# Altium PCB 0.PCB1.PcbDoc (part 4 of 12)
Units mm, origin at the board's own origin, x right, y up, seen from the top; angles counter-clockwise.
Board outline 77 x 72 mm, 6 copper layers (Top Layer, Layer 1, Layer 3, Layer 4, Layer 2, Bottom Layer), stack 1.538 mm thick; 570 components, 490 nets, 3331 pads, 1909 vias.
Unrouted connection lines stored in the file: 2.
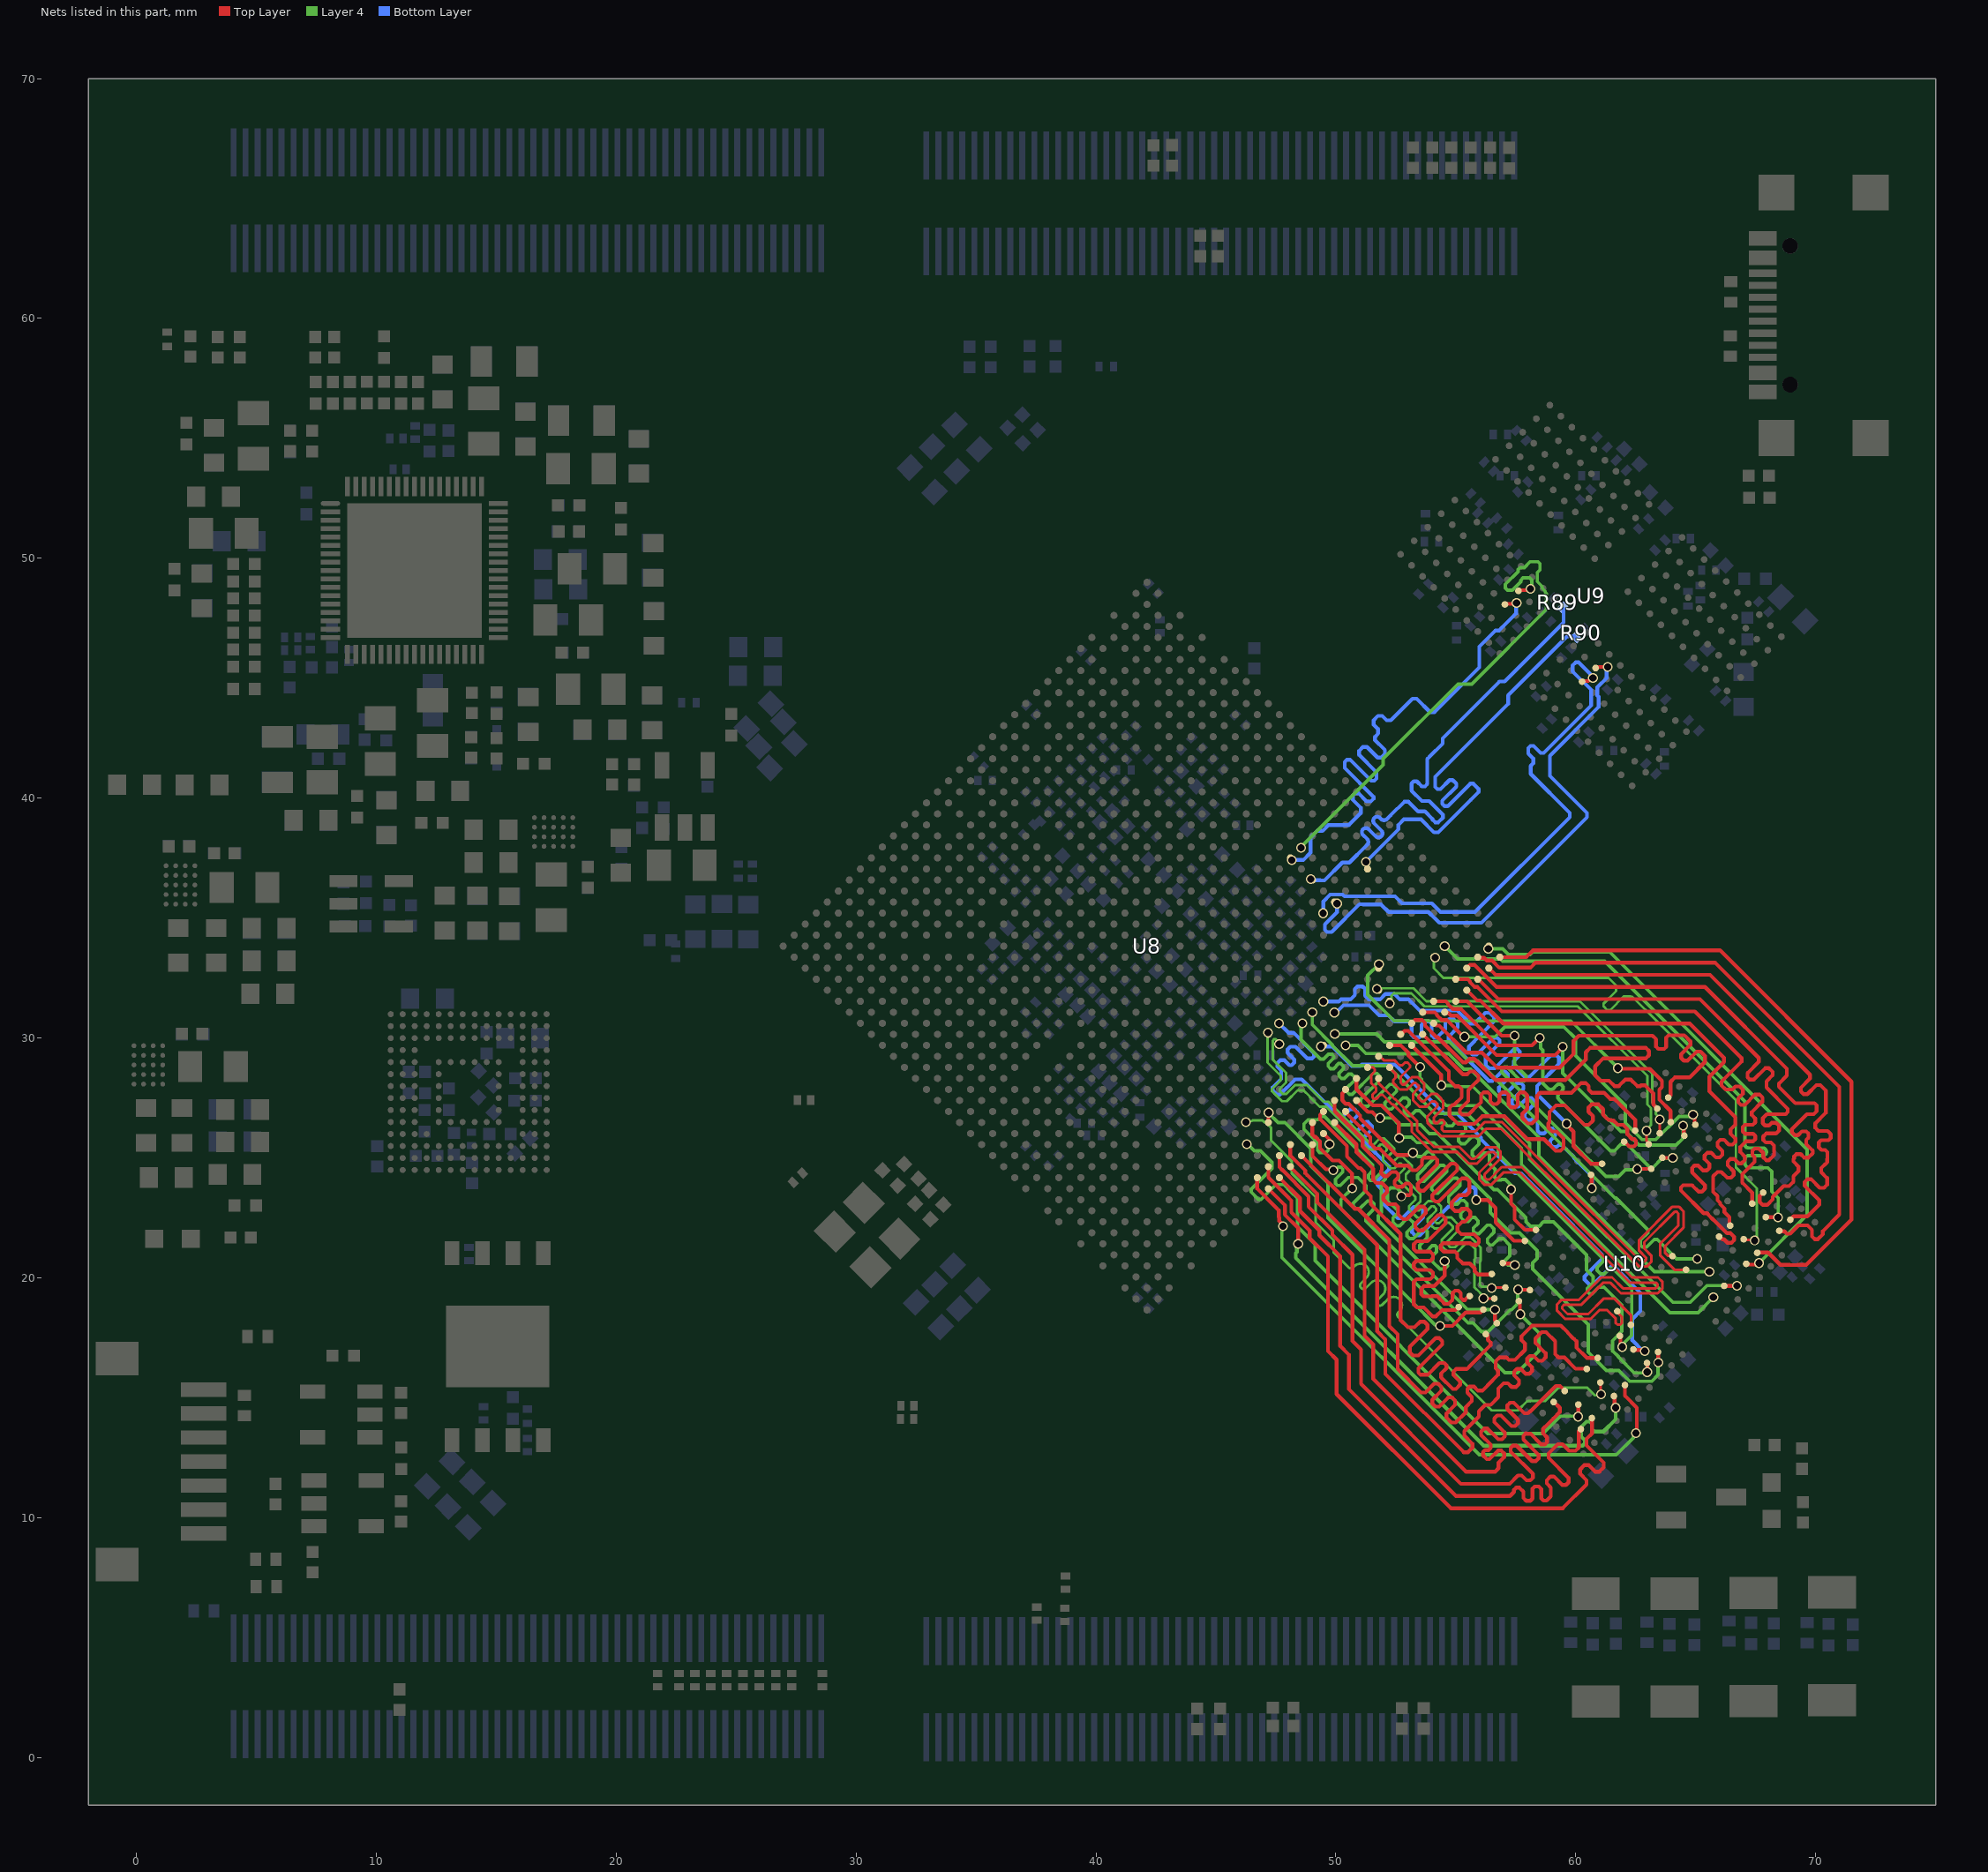
[diagram p8: the nets of this part, all layers, seen from the top]

## Via types
v1: diameter 0.41, hole 0.3, Top Layer to Bottom Layer, tented both sides, 1901 vias
v2: diameter 0.41, hole 0.3, Top Layer to Bottom Layer, 8 vias

## Nets (pads, with @x,y where several pads share a name; then routed paths per layer and width w, separated by ;. In a path a pad name is that pad's centre, name@x,y a point inside that pad or via, vN(x,y) a via of type N, cw(c..) or ccw(c..) an arc to the next point about the centre after c; other vN are vias at no path point) (continued)
DDR_CH0_LP4/4X_CKE1_A: R89.1 U8.N7 | length 22.1
  Bottom Layer w0.156: v1(48.963,36.627) 49.019,36.571 49.341,36.571 49.344,36.568 49.528,36.568 50.27,37.31 50.566,37.31 51.253,37.997 51.308,38.053 ccw(c51.19,38.171) 51.308,38.289 51.135,38.462 cw(c51.253,38.58) 51.135,38.698 cw(c51.253,38.58) 51.371,38.698 51.662,38.408 ccw(c51.781,38.526) 51.899,38.408 ccw(c51.781,38.526) 51.899,38.644 51.608,38.935 cw(c51.726,39.053) 51.608,39.171 cw(c51.726,39.053) 51.844,39.171 51.893,39.122 ccw(c52.011,39.241) 52.129,39.122 52.163,39.156 52.252,39.245 52.307,39.3 52.852,39.845 53.031,39.845 53.432,39.444 53.715,39.444 54.02,39.139 54.02,39.114 54.146,38.988 54.275,38.988 54.463,39.176 54.463,39.306 53.893,39.876 53.588,39.876 53.156,40.308 53.156,40.604 53.248,40.696 53.378,40.696 53.587,40.487 53.717,40.487 53.817,40.587 53.817,41.628 53.918,41.73 ; 53.915,41.734 54.453,42.272 54.453,42.488 56.824,44.858 57.039,44.858 59.497,47.316 R89.1@59.497,47.896
DDR_CH0_LP4/4X_CKE1_B: R90.1 U8.L4 | length 20.1
  Top Layer w0.156: v1(51.251,37.335) 51.295,37.291 51.295,37.071 U8.L4@51.323,37.043
  Bottom Layer w0.156: v1(51.251,37.335) 52.612,38.696 52.612,38.886 52.836,39.111 53.555,39.111 54.094,38.572 54.273,38.572 55.62,39.919 55.95,40.249 55.95,40.384 55.736,40.598 55.606,40.598 54.669,39.661 54.539,39.661 54.44,39.76 54.44,39.89 55.022,40.471 55.022,40.601 54.872,40.751 54.743,40.751 54.368,40.376 54.239,40.376 54.147,40.468 54.147,40.892 54.325,41.07 ; 54.326,41.068 57.183,43.924 57.183,44.284 59.643,46.744 59.936,46.744 R90.1@60.023,46.657
DDR_CH0_LP4/4X_CS0_A: U8.R6 U9.H4 | length 21
  Top Layer w0.156: U9.H4@57.615,48.64 57.639,48.664 57.978,48.664 58.034,48.72 v1(58.113,48.72)
  Layer 4 w0.142: v1(48.555,37.93) 48.555,37.965 51.978,41.388 51.978,41.646 55.089,44.757 55.673,44.757 58.784,47.868 58.784,48.523 58.734,48.573 58.734,48.623 58.603,48.754 58.603,48.822 58.4,49.026 58.4,49.399 58.512,49.512 58.512,49.772 58.429,49.855 58.104,49.855 57.86,49.611 57.685,49.611 57.601,49.528 57.601,49.444 57.073,48.916 57.073,48.756 57.165,48.664 57.355,48.664 57.706,49.015 57.706,49.073 57.81,49.177 58.084,49.177 58.17,49.091 58.17,49.066 58.165,49.06 58.165,48.793 v1@58.132,48.761
DDR_CH0_LP4/4X_CS0_B: U8.L7 U9.R4 | length 23.3
  Top Layer w0.156: U9.R4@60.833,45.423 60.856,45.446 60.937,45.446 60.955,45.464 v1(61.335,45.464)
  Bottom Layer w0.156: v1(50.052,35.6) 50.052,35.242 49.547,34.737 49.547,34.509 49.641,34.415 49.832,34.415 50.985,35.568 51.137,35.568 ; 51.137,35.559 51.893,35.559 52.203,35.249 53.86,35.249 54.141,34.968 ; 54.147,34.974 54.32,34.8 56.069,34.8 60.47,39.201 60.47,39.38 58.922,40.928 58.922,41.762 60.953,43.793 60.953,44.223 60.905,44.271 60.905,44.617 61.292,45.004 61.292,45.421 v1(61.335,45.464)
DDR_CH0_LP4/4X_CS1_A: U8.R7 U9.H3 | length 24.2
  Top Layer w0.156: U9.H3@57.05,48.074 57.073,48.098 57.499,48.098 v1(57.536,48.135)
  Bottom Layer w0.156: v1(48.172,37.417) 48.64,37.417 48.949,37.726 48.949,38.361 49.219,38.631 49.448,38.631 49.693,38.876 50.544,38.876 51.04,39.373 51.04,39.599 50.71,39.929 50.71,40.102 50.809,40.201 50.939,40.201 51.284,39.855 51.457,39.855 51.574,39.972 51.574,40.049 50.37,41.252 50.37,41.504 50.465,41.599 50.595,41.599 51.475,40.719 51.5,40.719 51.604,40.719 51.696,40.811 51.696,41.077 50.975,41.799 50.975,41.976 51.127,42.129 51.302,42.129 51.742,41.689 51.902,41.689 52.049,41.837 52.049,42.004 51.635,42.418 51.635,42.548 51.757,42.67 51.757,42.708 ; 51.759,42.703 51.759,42.883 51.579,43.062 51.579,43.242 51.759,43.422 51.938,43.422 52.118,43.242 52.298,43.242 53.196,44.14 53.375,44.14 53.932,43.583 54.112,43.583 55.979,45.451 55.979,46.31 56.658,46.989 56.809,46.989 57.515,47.695 57.515,48.114 v1(57.536,48.135)
DDR_CH0_LP4/4X_CS1_B: U8.L8 U9.R3 | length 23.8
  Top Layer w0.156: U9.R3@60.267,44.857 60.291,44.881 60.528,44.881 60.649,45.001 v1(60.718,45.001)
  Bottom Layer w0.156: v1(49.475,35.196) 49.48,35.201 49.48,35.688 49.768,35.976 50.285,35.976 50.36,35.9 52.471,35.9 52.763,35.609 54.004,35.609 54.363,35.249 55.8,35.249 59.751,39.201 59.751,39.38 58.125,41.006 58.125,41.34 58.231,41.446 58.231,41.649 58.026,41.854 58.026,42.08 58.117,42.172 58.247,42.172 58.537,41.881 58.667,41.881 60.649,43.864 60.649,44.509 59.87,45.289 59.87,45.527 60.005,45.663 60.117,45.663 60.708,45.073 v1@60.708,45.029
DDR_CH1_A0_C: U8.G12 U10.H2 | length 24.6
  Top Layer w0.156: v1@59.639,26.363 59.908,26.094 59.908,25.483 60.639,24.752 U10.H2@61.099,24.752
  Bottom Layer w0.156: v1@49.575,31.523 49.58,31.518 50.129,31.518 50.216,31.606 50.611,31.606 50.794,31.789 50.794,32.037 50.901,32.144 51.117,32.144 51.226,32.035 51.226,31.758 51.378,31.606 51.846,31.606 52.074,31.833 52.256,31.833 52.44,31.833 52.668,31.606 53.034,31.606 53.504,31.136 55.067,31.136 55.606,30.597 55.785,30.597 56.234,31.046 56.414,31.046 56.594,30.866 56.594,30.687 56.055,30.148 56.055,30.143 55.549,29.637 55.549,29.449 55.701,29.297 55.877,29.297 56.58,30 56.736,30 56.828,29.909 56.828,29.779 56.245,29.196 56.245,28.88 56.397,28.728 56.624,28.728 57.434,29.538 57.563,29.538 57.667,29.434 57.667,29.279 57.413,29.025 57.413,28.852 ; 57.402,28.841 57.863,28.38 58.076,28.38 58.965,29.269 59.209,29.269 59.301,29.177 59.301,28.904 58.39,27.993 58.39,27.654 v1(59.62,26.424)
  other v1: 49.48,31.518
DDR_CH1_A0_D: U8.H15 U10.R2 | length 27.7
  Top Layer w0.156: v1(55.849,23.239) 56.331,23.239 56.66,22.91 56.66,22.301 56.729,22.232 57.427,21.535 U10.R2@57.882,21.535
  Bottom Layer w0.156: v1(47.635,30.605) 48.026,30.215 48.235,30.215 49.092,29.358 49.092,29.228 49.009,29.144 48.81,29.144 48.323,29.632 48.099,29.632 47.99,29.523 47.99,29.381 48.269,29.101 48.269,28.972 48.158,28.86 48.066,28.86 47.858,29.068 47.69,29.068 47.562,28.94 47.562,28.805 47.726,28.641 47.726,28.293 47.369,27.937 47.369,27.807 47.54,27.636 47.67,27.636 48.308,28.273 48.582,28.273 48.879,27.976 ; 48.899,27.956 48.879,27.976 ; v1(55.849,23.239) 55.827,23.261 55.827,23.68 55.735,23.772 55.606,23.772 54.798,22.964 54.693,22.964 53.488,21.759 53.308,21.759 53.181,21.886 53.181,22.066 53.639,22.523 53.639,22.868 53.547,22.959 53.249,22.959 52.768,22.479 52.588,22.479 52.014,23.053 52.014,23.592 51.744,23.862 51.744,24.041 52.218,24.515 52.218,24.645 51.156,25.707 51.156,25.836 51.516,26.195 51.516,26.325 51.348,26.493 51.269,26.493 50.859,26.083 50.781,26.083 50.567,26.296 50.567,26.426 50.908,26.767 50.908,26.896 50.771,27.034 50.611,27.034 50.285,26.707 50.156,26.707 48.887,27.976 48.879,27.976
DDR_CH1_A1_C: U8.F12 U10.J2 | length 23
  Top Layer w0.156: U10.J2@60.639,24.293 60.663,24.269 60.663,23.744 v1(60.67,23.737)
  Bottom Layer w0.156: v1@49.981,31.087 50.048,31.087 50.318,31.358 51.387,31.358 51.81,30.935 52.191,30.935 52.44,30.687 53.022,30.687 53.158,30.55 53.158,30.126 53.255,30.028 53.484,30.028 53.576,30.12 53.576,30.544 53.713,30.681 ; 53.713,30.687 53.9,30.687 53.997,30.589 53.997,30.105 54.089,30.013 54.218,30.013 54.564,30.358 54.564,30.632 54.723,30.792 54.903,30.792 55.083,30.612 55.083,30.433 54.708,30.058 54.708,29.878 56.377,28.209 56.535,28.209 56.931,28.606 57.061,28.606 57.175,28.492 57.175,28.311 57.006,28.142 ; 57.006,28.141 56.804,27.94 56.804,27.782 56.916,27.67 57.073,27.67 ; 57.074,27.671 57.088,27.671 57.519,28.102 57.727,28.102 57.821,28.008 57.821,27.879 57.343,27.401 57.343,27.243 57.455,27.132 57.612,27.132 57.972,27.491 58.157,27.491 58.249,27.399 58.249,27.215 57.876,26.842 57.876,26.684 57.988,26.573 58.146,26.573 58.188,26.615 58.318,26.615 58.41,26.524 58.41,26.126 58.521,26.014 58.679,26.014 58.881,26.215 59.038,26.215 59.15,26.104 59.15,25.946 ; 59.145,25.926 58.943,25.725 58.943,25.567 59.055,25.455 59.213,25.455 59.291,25.534 59.421,25.534 59.62,25.334 59.926,25.028 59.926,25.002 60.679,24.25 60.679,23.745 v1(60.67,23.737)
  other v1: 49.94,31.059
DDR_CH1_A1_D: U8.G14 U10.P2 | length 24.9
  Top Layer w0.156: v1(57.309,23.679) 57.309,23.082 57.454,22.938 57.454,22.694 57.454,22.427 57.886,21.994 U10.P2@58.341,21.994
  Layer 4 w0.142: v1(48.608,30.609) 48.559,30.559 48.559,29.919 49.364,29.114 49.484,29.114 49.689,29.32 49.839,29.32 49.923,29.236 49.923,29.17 49.684,28.931 49.684,28.814 49.781,28.718 49.908,28.718 50.119,28.928 50.21,28.928 50.314,28.824 50.314,28.707 50.134,28.527 50.134,28.408 50.234,28.308 50.352,28.308 50.537,28.493 50.655,28.493 50.771,28.377 50.771,28.225 50.467,27.92 50.467,27.745 50.568,27.643 50.688,27.643 51.561,28.517 51.721,28.517 51.853,28.385 51.853,28.258 51.036,27.44 51.036,27.252 51.145,27.143 51.34,27.143 52.255,28.058 52.373,28.058 52.495,27.937 52.533,27.898 52.533,27.78 52.052,27.299 52.052,27.141 52.164,27.029 52.321,27.029 52.792,27.5 52.95,27.5 53.062,27.388 53.062,27.231 52.86,27.029 52.86,26.872 52.972,26.76 53.129,26.76 53.331,26.961 53.489,26.961 53.988,26.462 54.527,26.462 54.661,26.328 54.84,26.328 54.975,26.462 55.245,26.462 55.407,26.301 55.407,26.143 55.115,25.852 55.115,25.694 55.227,25.582 55.385,25.582 55.676,25.873 55.834,25.873 55.962,25.745 55.962,25.565 55.693,25.296 55.693,25.116 55.783,25.026 55.986,25.026 56.154,25.194 56.333,25.194 56.411,25.116 56.411,24.757 56.644,24.525 56.644,24.367 56.622,24.345 56.622,24.188 56.733,24.076 56.891,24.076 56.913,24.098 57.071,24.098 57.309,23.859 v1(57.309,23.679)
DDR_CH1_A2_C: U8.E13 U10.H9 | length 20.1
  Top Layer w0.156: U10.H9@65.059,20.792 65.062,20.792 v1(65.072,20.783)
  Layer 4 w0.142: v1(49.96,30.162) 49.962,30.16 51.711,30.16 52.031,29.84 54.741,29.84 55.531,29.05 55.905,29.05 61.638,23.317 61.678,23.317 63.002,21.993 63.002,21.875 62.707,21.58 62.707,21.359 62.791,21.275 62.961,21.275 63.273,21.588 63.403,21.588 64.208,20.783 v1(65.072,20.783)
DDR_CH1_A2_D: U8.G13 U10.R9 | length 22.5
  Top Layer w0.156: U10.R9@61.842,17.575 61.865,17.551 61.865,17.276 61.945,17.197 v1(61.945,17.117)
  Layer 4 w0.142: v1@49.016,31.037 49.023,31.03 49.023,30.551 49.862,29.712 49.862,29.676 50.701,28.837 52.152,28.837 54.146,26.843 55.47,26.843 56.771,25.543 56.771,25.162 58.109,23.823 61.143,20.79 61.143,20.672 60.899,20.428 60.899,20.31 61.046,20.163 61.196,20.163 61.423,20.391 61.542,20.391 62.338,19.594 62.338,17.604 v1@61.925,17.19
  other v1: 49.023,31.063
DDR_CH1_A3_C: U8.D13 U10.H10 | length 19.6
  Top Layer w0.156: v1(65.572,20.247) 65.597,20.247 U10.H10@65.628,20.216
  Layer 4 w0.142: v1(50.405,29.688) 50.918,29.688 51.258,29.348 52.192,29.348 52.204,29.337 54.704,29.337 55.341,28.7 55.62,28.7 58.47,25.85 58.47,25.066 63.289,20.247 v1(65.572,20.247)
DDR_CH1_A3_D: U8.E14 U10.R10 | length 23.2
  Top Layer w0.156: U10.R10@62.407,17.009 62.431,16.986 62.838,16.986 v1(62.885,16.94)
  Bottom Layer w0.156: v1(49.383,29.643) 49.385,29.641 49.853,29.641 50.664,28.83 51.025,28.83 51.085,28.891 52.463,28.891 54.522,26.832 55.066,26.832 56.055,25.843 56.055,25.765 57.467,24.353 57.719,24.353 58.179,23.893 58.749,23.323 61.099,20.973 61.099,20.783 60.369,20.052 60.369,19.923 60.588,19.703 60.718,19.703 61.478,20.464 61.608,20.464 62.7,19.371 62.7,18.617 62.359,18.276 62.359,17.39 62.807,16.942 v1@62.826,16.942
DDR_CH1_A4_C: U8.A10 U10.H11 | length 19.3
  Top Layer w0.156: U8.A10@53.161,29.689 53.704,29.146 54.391,28.46 54.391,28.03 v1(54.401,28.02) ; U10.H11@66.263,19.683 66.288,19.657 v1(66.72,19.657)
  Layer 4 w0.142: v1(54.401,28.02) 54.907,28.02 54.961,27.965 55.718,27.965 58.084,25.599 58.084,24.941 58.656,24.369 64.05,18.974 64.772,18.974 65.469,19.671 v1@66.655,19.671
DDR_CH1_A4_D: U8.A15 U10.R11 | length 20.4
  Top Layer w0.156: U8.A15@50.863,27.391 51.341,26.913 51.518,26.913 51.77,26.661 v1(51.849,26.661) ; v1(62.981,16.069) 62.986,16.073 U10.R11@62.986,16.381
  Layer 4 w0.142: v1(51.849,26.661) 52.352,26.661 52.64,26.373 53.538,26.373 53.897,26.014 54.256,26.014 56.591,23.679 56.747,23.679 57.925,22.501 57.925,22.393 57.938,22.38 57.938,22.332 58.118,22.153 58.477,22.153 58.656,22.332 59.067,22.332 60.453,20.946 60.453,20.327 60.733,20.046 60.733,19.795 60.489,19.551 60.489,19.419 60.573,19.336 60.691,19.336 60.954,19.599 61.175,19.599 ; 61.178,19.602 61.925,18.854 61.925,17.77 61.53,17.375 61.53,16.946 61.546,16.946 61.773,16.719 61.773,16.701 62.444,16.03 62.943,16.03 v1(62.981,16.069)
DDR_CH1_A5_C: U8.B11 U10.J11 | length 19.2
  Top Layer w0.156: U8.B11@52.242,29.689 52.709,29.689 53.029,29.369 53.029,29.264 53.425,28.867 v1(53.512,28.781) ; U10.J11@65.731,19.201 65.74,19.19 v1(65.74,19.182)
  Layer 4 w0.142: v1(53.512,28.781) 53.507,28.776 53.507,28.339 53.579,28.268 53.579,28.204 54.606,27.176 55.968,27.176 57.74,25.404 57.74,24.725 58.376,24.09 63.923,18.542 65.099,18.542 v1(65.74,19.182)
DDR_CH1_A5_D: U8.B14 U10.P11 | length 21.3
  Top Layer w0.156: U8.B14@50.865,28.312 50.863,28.309 50.863,27.858 51.54,27.182 51.74,27.182 51.901,27.182 52.628,26.454 52.628,25.845 v1(52.646,25.827) ; U10.P11@63.433,16.903 63.438,16.898 63.438,16.462 v1(63.443,16.457)
  Layer 4 w0.142: v1(52.646,25.827) 52.677,25.857 53.156,25.857 53.38,25.633 54.098,25.633 56.447,23.284 56.447,22.714 56.724,22.437 57.296,21.865 57.651,21.865 58.387,21.129 58.387,20.806 58.207,20.626 58.207,20.361 60.524,18.045 60.524,16.897 61.285,16.136 61.8,16.136 62.255,15.681 63.168,15.681 63.438,15.951 v1@63.438,16.495
DDR_CH1_CLKN_C: U8.A12 U10.J9 | length 23.5
  Top Layer w0.112: U8.A12@52.244,28.771 52.244,28.758 52.498,28.504 52.498,28.346 52.389,28.237 52.389,28.132 52.675,27.846 52.978,27.846 53.255,28.123 53.337,28.123 53.456,28.004 53.456,27.912 53.282,27.739 53.282,27.724 53.225,27.666 53.225,27.396 53.496,27.125 53.771,27.125 53.995,27.349 54.132,27.349 54.24,27.24 54.24,27.147 53.812,26.719 53.812,26.518 ; 53.822,26.477 53.822,26.46 54.387,25.895 55.95,25.895 56.273,26.218 56.883,26.218 58.706,24.395 58.715,24.395 62.645,20.465 62.959,20.465 63.149,20.656 63.149,20.925 62.861,21.213 62.861,21.486 64.122,22.748 64.215,22.748 64.28,22.682 64.28,22.173 63.517,21.41 63.517,20.942 64.126,20.333 U10.J9@64.595,20.333
DDR_CH1_CLKN_D: U8.A13 U10.P9 | length 27.2
  Top Layer w0.112: U8.A13@51.785,28.312 51.797,28.3 51.797,28.099 52.454,27.442 52.479,27.442 53.385,26.535 53.385,26.17 54.096,25.459 55.15,25.459 55.645,24.964 55.785,24.964 56.263,25.442 56.683,25.442 56.874,25.251 56.874,24.982 56.195,24.304 56.195,24.182 56.282,24.096 56.404,24.096 56.915,24.607 57.748,24.607 58.321,24.035 60.122,22.233 62.346,20.01 63.433,20.01 63.624,19.82 63.624,19.55 63.421,19.348 61.886,19.348 61.433,19.8 61.161,19.8 60.227,18.867 59.505,18.867 59.439,18.801 59.439,18.709 59.659,18.489 60.525,18.489 61.158,19.121 61.621,19.121 62.301,18.441 U10.P9@62.301,18.035
DDR_CH1_CLKP_C: U8.B12 U10.J8 | length 24.7
  Top Layer w0.112: U8.B12@51.785,29.231 51.832,29.231 U8.B12@51.828,29.231 ; U8.B12@51.838,29.228 51.838,29.224 51.995,29.067 52.443,29.067 52.651,28.859 52.774,28.859 52.892,28.976 52.984,28.976 53.099,28.862 53.099,28.769 52.711,28.381 52.711,28.125 52.776,28.059 52.869,28.059 53.167,28.357 53.423,28.357 53.682,28.098 53.682,27.811 53.446,27.575 53.446,27.488 53.581,27.353 53.674,27.353 53.984,27.663 54.203,27.663 54.398,27.468 54.398,27.445 54.48,27.364 54.48,27.265 54.477,27.262 54.477,27.064 54.084,26.67 54.084,26.5 54.139,26.445 54.231,26.445 54.373,26.587 54.383,26.587 ; 54.383,26.584 54.447,26.584 54.524,26.507 54.524,26.414 54.428,26.319 54.428,26.174 54.493,26.109 55.823,26.109 56.197,26.482 56.938,26.482 58.866,24.554 58.866,24.546 62.733,20.678 62.87,20.678 62.936,20.744 62.936,20.836 62.647,21.125 62.647,21.575 64.034,22.961 64.303,22.961 64.494,22.771 64.494,22.085 63.73,21.321 63.73,21.03 63.842,20.919 64.03,20.919 U10.J8@64.039,20.909
DDR_CH1_CLKP_D: U8.B13 U10.P8 | length 28.8
  Top Layer w0.112: U8.B13@51.356,28.822 U8.B13@51.403,28.774 ; U8.B13@51.368,28.781 51.375,28.774 U8.B13@51.403,28.774 ; 52.372,27.224 52.351,27.224 51.952,27.624 51.859,27.624 51.691,27.456 51.599,27.456 51.524,27.531 51.524,27.623 51.686,27.785 51.686,27.908 51.485,28.109 51.485,28.456 51.627,28.598 51.627,28.691 51.544,28.774 U8.B13@51.403,28.774 ; 52.39,27.228 53.172,26.447 53.172,26.082 54.008,25.245 55.062,25.245 55.557,24.75 55.873,24.75 56.351,25.228 56.595,25.228 56.66,25.163 56.66,25.07 55.982,24.392 55.982,24.094 56.193,23.882 56.492,23.882 57.004,24.394 57.66,24.394 59.909,22.145 62.257,19.797 63.345,19.797 63.41,19.731 63.41,19.639 63.333,19.561 61.974,19.561 61.521,20.014 61.072,20.014 60.139,19.08 59.416,19.08 59.226,18.89 59.226,18.62 59.571,18.275 60.614,18.275 60.982,18.644 61.32,18.644 61.67,18.293 61.67,18.107 61.736,18.042 61.856,18.042 61.922,18.107 61.922,18.368 61.759,18.531 U10.P8@61.759,18.606
DDR_CH1_DM0_C: U8.F8 U10.C3 | length 17.1
  Top Layer w0.156: v1@61.784,28.714 63,28.714 63.092,28.714 63.601,28.205 63.601,27.947 63.491,27.837 63.491,27.421 63.953,26.958 U10.C3@63.953,26.501
  Layer 4 w0.142: v1(51.8,33.076) 51.334,32.611 51.334,31.808 52.434,30.709 55.267,30.709 59.799,30.709 v1@61.746,28.762
  other v1: 61.757,28.741
DDR_CH1_DM0_D: U8.D20 U10.Y3 | length 14.4
  Top Layer w0.156: U8.D20@47.186,26.471 47.192,26.478 47.192,26.877 v1(47.198,26.883) ; v1(54.34,17.994) 54.861,17.994 55.418,18.55 56.028,18.55 U10.Y3@56.149,18.671
  Layer 4 w0.142: v1(47.198,26.883) 47.198,26.861 47.596,26.463 47.88,26.463 48.958,25.385 48.958,24.667 49.676,23.949 49.676,22.871 ; 49.677,22.871 49.677,22.499 53.231,18.945 54.131,18.045 ; v1@54.287,18.045 v1@54.295,18.052
DDR_CH1_DM1_C: U8.D4 U10.C10 | length 23.1
  Top Layer w0.156: U10.C10@67.939,22.528 67.946,22.521 68.425,22.521 v1(68.429,22.516)
  Layer 4 w0.142: v1(54.541,33.83) 55.083,33.288 56.86,33.288 56.95,33.198 61.206,33.198 67.05,27.355 67.05,25.641 67.05,25.57 ccw(c67.21,25.57) 67.21,25.409 67.793,25.409 cw(c67.793,25.249) 67.793,25.089 67.21,25.089 ccw(c67.21,24.929) 67.05,24.929 67.05,24.715 67.131,24.633 67.162,24.603 ; 67.173,24.614 67.203,24.585 68.015,24.585 68.176,24.425 68.176,23.59 68.445,23.32 68.445,22.589 v1@68.499,22.535
DDR_CH1_DM1_D: U8.D22 U10.Y10 | length 23.2
  Top Layer w0.156: v1(60.107,14.212) 60.108,14.213 60.108,14.71 U10.Y10@60.109,14.711
  Layer 4 w0.142: v1(46.286,25.57) 46.324,25.57 46.599,25.295 46.858,25.295 47.34,24.814 47.34,24.557 46.47,23.688 46.47,23.57 46.769,23.271 46.887,23.271 47.5,23.884 47.827,23.884 48.135,23.577 48.399,23.312 48.399,22.126 49.137,21.388 49.137,20.705 56.338,13.504 58.629,13.504 59.351,14.226 60.093,14.226 v1(60.107,14.212)
DDR_CH1_DQ0_C: U8.A8 U10.B2 | length 18.1
  Top Layer w0.156: U8.A8@54.083,30.61 54.182,30.511 54.313,30.511 55.438,29.386 56.093,29.386 56.717,28.762 59.339,28.762 59.914,29.337 59.914,29.876 60.128,30.09 63.201,30.09 63.352,29.939 63.352,29.632 63.444,29.541 63.69,29.541 63.769,29.619 63.769,30.005 63.873,30.11 64.515,30.11 ; U10.B2@63.863,27.52 63.955,27.612 63.955,28.17 64.134,28.349 64.745,28.349 65.392,28.996 65.392,29.247 65.206,29.433 65.048,29.433 64.667,29.052 64.509,29.052 64.398,29.164 64.398,29.321 64.779,29.702 64.779,29.86 64.549,30.09
DDR_CH1_DQ0_D: U8.A17 U10.AA2 | length 18.8
  Top Layer w0.156: U8.A17@49.946,26.473 50.862,25.558 50.862,25.236 51.562,24.536 51.562,24.076 51.69,23.949 51.929,23.949 52.132,23.746 52.132,23.567 51.98,23.415 51.98,23.261 52.173,23.068 52.489,23.068 52.6,22.957 52.6,22.641 52.802,22.44 52.959,22.44 53.483,22.964 53.641,22.964 53.752,22.852 53.752,22.694 53.319,22.26 53.319,22.102 53.448,21.973 53.628,21.973 54.256,22.602 54.436,22.602 54.579,22.458 54.579,22.278 53.825,21.524 53.376,21.524 53.249,21.397 53.249,21.195 53.36,21.084 53.936,21.084 54.048,20.973 54.048,20.814 53.936,20.703 53.36,20.703 53.249,20.592 53.249,20.433 53.36,20.322 53.936,20.322 54.048,20.211 54.048,20.053 53.936,19.942 53.36,19.942 53.249,19.83 53.249,18.886 53.376,18.758 53.662,18.758 54.038,18.382 54.167,18.382 54.436,18.65 54.993,18.65 U10.AA2@55.13,18.787
DDR_CH1_DQ1_C: U8.B9 U10.C2 | length 18.6
  Top Layer w0.156: U8.B9@53.164,30.61 53.302,30.748 53.594,30.748 53.721,30.62 53.721,30.508 54.2,30.03 54.246,30.03 55.298,28.978 55.424,28.978 55.573,29.128 55.773,29.128 56.659,28.241 59.569,28.241 60.422,29.094 60.422,29.404 60.6,29.582 62.93,29.582 63.057,29.455 63.057,29.275 62.93,29.148 61.148,29.148 60.812,28.812 60.812,28.439 61.034,28.217 61.393,28.217 61.62,27.99 61.8,27.99 62.069,28.259 62.296,28.259 62.565,27.99 62.698,27.99 62.725,28.018 62.897,28.018 63.236,27.678 63.236,27.227 U10.C2@63.403,27.06
DDR_CH1_DQ1_D: U8.B16 U10.Y2 | length 20.5
  Top Layer w0.156: U8.B16@49.946,27.392 49.946,26.937 51.12,25.763 51.12,25.481 51.914,24.687 51.914,24.471 51.885,24.442 51.885,24.36 52.012,24.233 52.142,24.233 52.321,24.412 52.506,24.412 52.6,24.318 52.6,24.176 52.453,24.029 52.453,23.899 52.562,23.79 52.775,23.79 52.915,23.929 53.044,23.929 53.136,23.838 53.136,23.508 53.067,23.439 52.826,23.439 v1@52.763,23.376 ; 54.505,18.944 54.315,19.133 54.315,19.148 54.23,19.233 54.01,19.233 53.997,19.221 53.657,19.221 53.565,19.312 53.565,19.538 53.677,19.65 54.099,19.65 54.538,20.089 v1(54.538,20.698) ; 54.52,18.91 54.699,18.91 54.858,19.068 54.858,19.211 54.868,19.221 54.868,19.362 54.967,19.462 55.11,19.462 55.211,19.36 55.211,19.167 55.31,19.068 55.382,19.068 55.547,19.233 U10.Y2@55.585,19.233
  Layer 4 w0.142: v1(52.734,23.39) 52.676,23.448 52.676,23.624 52.548,23.751 52.286,23.751 52.159,23.624 52.159,23.192 52.3,23.051 52.333,23.051 52.581,22.803 52.581,22.685 52.389,22.493 52.389,22.314 52.534,22.168 52.67,22.168 52.953,22.451 53.08,22.451 53.238,22.293 53.238,22.175 52.962,21.899 52.962,21.741 53.073,21.629 53.231,21.629 53.615,22.014 53.733,22.014 53.817,21.93 53.817,21.676 53.5,21.36 53.5,21.202 53.612,21.091 53.77,21.091 54.02,21.341 54.138,21.341 54.195,21.283 54.195,21.082 54.045,20.932 54.045,20.808 ; 54.039,20.821 54.039,20.663 54.346,20.357 54.526,20.357 54.653,20.484 54.653,20.511 54.538,20.625 v1(54.538,20.698)
DDR_CH1_DQ2_C: U8.A9 U10.E2 | length 18.4
  Top Layer w0.156: U8.A9@53.623,30.15 55.293,28.48 55.472,28.48 55.592,28.601 55.765,28.601 55.944,28.421 55.944,28.241 55.693,27.99 55.524,27.821 55.524,27.371 55.176,27.024 55.176,26.894 55.268,26.802 55.534,26.802 55.95,27.219 55.968,27.219 56.059,27.311 56.059,27.621 56.171,27.733 56.329,27.733 56.441,27.621 56.44,27.353 56.552,27.242 56.71,27.242 56.821,27.353 56.822,27.621 56.933,27.733 57.09,27.733 57.202,27.621 57.202,27.217 57.314,27.106 57.471,27.106 57.582,27.217 57.582,27.619 57.695,27.731 57.853,27.731 57.98,27.604 57.98,27.044 57.776,26.84 57.776,26.661 58.002,26.435 58.182,26.435 58.387,26.639 58.387,27.581 58.514,27.708 59.824,27.708 60.234,28.119 60.414,28.119 60.542,27.99 60.542,27.836 60.67,27.708 61.183,27.708 61.44,27.451 61.61,27.451 61.694,27.367 61.702,27.367 61.933,27.136 61.933,27.128 62.042,27.019 62.046,27.019 62.234,26.83 62.234,26.827 62.484,26.578 U10.E2@62.484,26.141
DDR_CH1_DQ2_D: U8.A16 U10.V2 | length 22.3
  Top Layer w0.156: U8.A16@50.406,26.933 50.406,26.895 51.436,25.864 51.436,25.601 51.652,25.386 51.831,25.386 52.545,24.672 52.999,24.672 53.189,24.483 53.368,24.483 53.59,24.705 53.59,24.91 53.69,25.01 54.13,25.01 54.23,24.91 54.23,24.73 53.415,23.915 53.415,23.736 53.523,23.627 53.665,23.627 54.795,24.757 54.965,24.757 55.059,24.662 55.059,24.483 54.021,23.444 54.021,23.302 54.148,23.175 54.29,23.175 55.261,24.145 55.441,24.145 55.568,24.018 55.568,23.572 55.44,23.444 55.138,23.444 54.832,23.139 54.832,22.924 54.975,22.781 55.154,22.781 55.244,22.871 55.476,22.871 55.603,22.744 55.603,22.564 55.371,22.332 55.262,22.332 55.073,22.144 55.073,21.964 55.226,21.812 55.765,21.812 55.962,21.614 55.962,21.472 55.835,21.345 55.811,21.345 55.775,21.38 55.675,21.38 55.631,21.423 55.614,21.423 55.603,21.434 54.466,21.434 54.374,21.343 54.374,21.213 54.503,21.085 54.97,21.085 55.062,20.993 55.062,20.824 55.297,20.589 55.588,20.589 55.787,20.39 55.787,20.273 55.928,20.132 56.132,20.132 ; 56.133,20.132 56.475,20.132 U10.V2@56.509,20.166
DDR_CH1_DQ3_C: U8.B10 U10.F2 | length 19.3
  Top Layer w0.156: U8.B10@52.704,30.15 52.723,30.15 52.865,30.292 53.025,30.292 54.71,28.608 54.71,28.255 54.975,27.99 55.117,27.99 55.244,27.863 55.244,27.523 54.924,27.203 54.86,27.203 54.737,27.08 54.737,26.773 55.1,26.41 55.783,26.41 56.107,26.733 57.035,26.733 57.988,25.78 58.676,25.78 59.163,25.292 59.363,25.292 59.495,25.425 59.495,25.804 59.195,26.104 59.017,26.104 58.864,26.257 58.864,26.437 58.908,26.481 58.908,26.908 59.182,27.182 59.554,27.182 60.363,26.373 60.542,26.373 60.722,26.553 60.722,26.733 60.534,26.92 60.534,27.1 60.662,27.227 60.946,27.227 61.144,27.029 61.144,26.858 61.144,26.809 61.171,26.782 61.171,26.765 61.298,26.638 61.315,26.638 61.375,26.578 61.477,26.578 61.509,26.547 61.581,26.547 61.753,26.375 61.978,26.375 62.156,26.197 62.156,25.976 62.353,25.779 62.445,25.779 62.51,25.714 62.51,25.556 62.427,25.474 ; U10.F2@62.024,25.682 62.23,25.475 62.403,25.475
DDR_CH1_DQ3_D: U8.B15 U10.U2 | length 19.5
  Top Layer w0.156: U8.B15@50.406,27.852 50.406,27.816 50.27,27.68 50.27,27.396 50.415,27.251 50.536,27.251 51.02,26.767 51.02,26.645 52.549,25.116 52.999,25.116 ; U10.U2@56.992,20.623 57.025,20.589 57.406,20.589 v1(57.464,20.531)
  Layer 4 w0.142: v1@53.294,25.181 53.425,25.049 53.605,25.049 53.807,25.252 53.941,25.252 54.077,25.116 54.077,24.958 53.402,24.284 53.402,24.11 53.485,24.026 53.683,24.026 54.346,24.689 54.504,24.689 54.616,24.577 54.616,24.42 53.995,23.799 53.995,23.681 54.147,23.53 54.265,23.53 54.885,24.15 55.043,24.15 55.17,24.023 55.17,23.843 54.706,23.379 54.706,23.15 54.789,23.067 55.065,23.067 55.219,23.221 55.336,23.221 55.462,23.095 55.462,22.944 55.206,22.688 55.206,22.576 55.221,22.561 55.221,22.505 55.371,22.355 55.521,22.355 55.677,22.51 55.795,22.51 55.928,22.377 55.928,22.259 55.736,22.067 55.736,21.949 55.85,21.835 55.961,21.835 56.052,21.926 56.052,21.931 56.314,22.192 56.443,22.192 56.593,22.042 56.593,21.895 56.321,21.623 56.321,21.463 56.421,21.364 56.539,21.364 56.809,21.634 56.985,21.634 57.259,21.36 57.259,20.915 57.073,20.729 57.073,20.625 57.18,20.518 57.33,20.518 v1@57.34,20.529
  other v1: 53.214,25.209
DDR_CH1_DQ4_C: U8.A6 U10.F4 | length 14.7
  Top Layer w0.156: U8.A6@55.002,31.529 55.477,31.529 56.911,30.095 57.441,30.095 v1(57.449,30.087) ; v1(62.565,24.526) 62.572,24.533 63.143,24.533 U10.F4@63.15,24.54
  Layer 4 w0.142: v1(57.449,30.087) 57.449,28.903 57.936,28.416 57.936,28.298 57.838,28.2 57.72,28.2 57.138,28.782 57.02,28.782 56.918,28.679 56.918,28.561 59.883,25.596 61.261,24.218 61.8,24.218 62.075,24.494 62.532,24.494 v1(62.565,24.526)
DDR_CH1_DQ4_D: U8.A19 U10.U4 | length 17.1
  Top Layer w0.156: U8.A19@49.025,25.552 49.035,25.542 49.035,25.074 49.592,24.517 49.853,24.517 v1(49.889,24.481) ; v1@57.525,19.505 57.536,19.495 58.083,19.495 U10.U4@58.094,19.484
  Layer 4 w0.142: v1@50.007,24.56 50.027,24.54 50.031,24.54 50.102,24.61 50.21,24.61 50.291,24.53 50.291,24.412 49.983,24.104 49.983,23.93 50.065,23.848 50.185,23.848 50.515,24.179 50.921,24.179 51.253,23.847 51.253,23.636 50.725,23.109 50.725,22.991 50.84,22.876 50.995,22.876 51.32,23.201 51.477,23.201 51.597,23.081 51.597,22.886 51.556,22.845 ; 51.531,22.807 51.251,22.528 51.251,22.374 55.513,18.112 55.715,18.112 56.081,17.745 56.353,17.745 57.268,18.66 57.33,18.66 57.557,18.887 57.557,18.949 57.579,18.971 v1@57.579,19.494
  other v1: 57.601,19.505
DDR_CH1_DQ5_C: U8.B7 U10.E4 | length 15.7
  Top Layer w0.156: U8.B7@54.083,31.529 54.589,31.529 54.68,31.437 54.68,31.395 54.867,31.208 54.915,31.208 54.924,31.2 55.232,31.2 56.74,29.691 58.183,29.691 58.488,29.996 v1(58.504,29.996) ; U10.E4@63.609,25 63.613,24.995 64.041,24.995 v1(64.045,24.991)
  Layer 4 w0.142: v1(58.504,29.996) 58.535,29.964 58.535,29.578 58.632,29.482 58.632,28.105 58.846,27.89 ccw(c58.959,28.004) 59.072,27.89 59.205,28.023 cw(c59.318,27.91) 59.432,28.023 cw(c59.318,27.91) 59.432,27.797 59.299,27.664 ccw(c59.412,27.551) 59.299,27.437 60.029,26.708 61.44,25.296 61.62,25.296 61.889,25.565 62.133,25.565 63.103,24.595 63.221,24.595 63.603,24.977 64.031,24.977 v1(64.045,24.991)
DDR_CH1_DQ5_D: U8.B18 U10.V4 | length 18.6
  Top Layer w0.156: U8.B18@49.025,26.471 49.025,25.964 49.116,25.872 49.157,25.872 49.347,25.682 49.347,25.403 49.865,24.886 50.131,24.886 50.679,24.337 v1@50.679,23.727 ; U10.V4@57.601,19.048 57.661,18.989 57.661,18.908 57.678,18.891 57.678,18.489 v1(57.692,18.474)
  Layer 4 w0.142: v1@50.682,23.728 50.215,23.261 50.215,22.878 57.05,16.043 57.561,16.043 58.462,16.945 58.462,17.704 57.731,18.436 v1@57.731,18.489
  other v1: 50.682,23.724
DDR_CH1_DQ6_C: U8.A7 U10.C4 | length 14.2
  Top Layer w0.156: U8.A7@54.542,31.069 54.571,31.04 54.685,31.04 54.799,30.926 55.059,30.926 56.701,29.283 59.141,29.283 v1@59.465,29.606 ; v1(64.485,26.338) 64.507,26.316 64.507,25.941 U10.C4@64.529,25.919
  Layer 4 w0.142: v1@59.465,29.606 59.465,28.529 59.825,28.168 60.831,27.162 61.151,26.843 61.151,26.812 61.378,26.585 61.408,26.585 61.889,26.104 62.069,26.104 62.647,25.526 63.05,25.526 64.185,25.526 64.475,25.817 v1@64.475,26.35
  other v1: 59.463,29.628
DDR_CH1_DQ6_D: U8.A18 U10.Y4 | length 17
  Top Layer w0.156: U8.A18@49.484,26.012 49.743,25.753 49.743,25.574 v1@49.736,25.568 ; v1@56.636,18.616 56.636,18.218 56.715,18.139 U10.Y4@56.715,18.105
  Layer 4 w0.142: v1@49.626,25.601 v1@49.651,25.576 ; v1@49.727,25.55 49.682,25.505 49.682,25.317 49.586,25.22 49.328,25.22 49.245,25.303 49.245,25.624 48.671,26.198 48.671,26.419 48.841,26.589 49.255,26.589 49.387,26.721 49.522,26.721 49.923,26.32 ; 49.874,26.363 51.528,24.709 51.528,24.638 ; 51.528,24.58 51.528,24.638 ; 51.531,24.458 51.361,24.288 51.361,24.142 51.445,24.058 51.563,24.058 51.853,24.348 51.971,24.348 52.064,24.255 52.064,24.11 51.903,23.949 51.903,22.71 51.778,22.584 51.778,22.386 55.172,18.992 55.497,18.667 v1@56.575,18.667 ; 51.531,24.491 51.531,24.636 51.528,24.638
  other v1: 56.636,18.667 49.741,25.567
DDR_CH1_DQ7_C: U8.B8 U10.B4 | length 15.5
  Top Layer w0.156: U8.B8@53.621,31.068 54.129,31.068 54.22,30.976 54.22,30.935 54.407,30.748 54.619,30.748 55.321,30.046 v1(55.366,30.046) ; v1@64.942,26.744 64.942,26.661 64.962,26.641 64.962,26.405 U10.B4@64.988,26.379
  Layer 4 w0.142: v1(55.366,30.046) 56.635,30.046 57.054,30.465 59.504,30.465 60.004,29.966 60.004,29.247 62.069,27.182 62.069,26.455 62.764,25.76 62.953,25.76 63.342,25.76 64.314,26.733 v1@64.909,26.733
  other v1: 64.891,26.795
DDR_CH1_DQ7_D: U8.B17 U10.AA4 | length 22.8
  Top Layer w0.156: U8.B17@49.487,26.933 49.344,26.79 49.344,26.61 50.467,25.488 50.467,25.057 50.946,24.577 51.023,24.577 51.203,24.398 51.203,23.657 51.461,23.399 51.461,23.062 52.699,21.824 52.699,18.232 52.999,17.932 53.283,17.932 53.516,18.165 53.696,18.165 53.823,18.037 53.823,17.858 53.085,17.12 53.085,16.888 53.212,16.761 53.444,16.761 54.166,17.483 54.309,17.483 54.436,17.356 54.436,17.214 53.448,16.226 53.448,16.046 53.54,15.954 53.83,15.954 54.32,16.444 54.52,16.444 54.611,16.354 54.611,16.225 54.388,16.002 54.388,15.847 54.875,15.361 55.004,15.361 55.178,15.535 55.178,15.675 54.903,15.95 54.903,16.08 55.016,16.193 55.463,16.193 55.597,16.327 56.447,17.178 56.447,17.307 56.343,17.411 56.343,17.574 U10.AA4@56.261,17.656
DDR_CH1_DQ8_C: U8.A3 U10.B11 | length 26.7
  Top Layer w0.156: U8.A3@56.381,32.908 56.658,32.631 65.6,32.631 69.769,28.462 69.769,28.304 69.388,27.923 69.388,27.765 69.5,27.654 69.657,27.654 70.038,28.035 70.196,28.035 70.426,27.805 70.426,26.876 69.992,26.442 69.992,26.244 70.119,26.117 70.502,26.117 70.634,25.985 70.634,25.825 70.542,25.733 70.228,25.733 70.136,25.641 70.136,25.436 70.243,25.329 70.4,25.329 70.492,25.238 70.492,24.951 70.489,24.948 70.489,24.819 70.383,24.712 ; U10.B11@68.954,22.429 69.085,22.56 69.661,22.56 70.151,23.051 70.151,23.23 69.542,23.839 69.542,23.982 69.669,24.109 69.812,24.109 70.173,23.748 70.352,23.748 70.482,23.877 70.482,24.157 70.241,24.398 70.241,24.577 70.379,24.716 70.392,24.728
DDR_CH1_DQ8_D: U8.A22 U10.AA11 | length 27.8
  Top Layer w0.156: U8.A22@47.648,24.175 48.509,23.315 48.509,22.782 49.317,21.973 49.317,21.767 50.184,20.9 50.184,17.155 50.544,16.795 50.544,15.358 55.005,10.897 57.261,10.897 57.429,11.065 57.429,11.153 57.52,11.245 57.657,11.245 57.817,11.085 57.817,10.821 57.939,10.699 58.107,10.699 58.198,10.79 58.198,11.202 58.295,11.298 58.455,11.298 58.462,11.291 58.521,11.232 58.567,11.186 58.567,10.796 58.658,10.704 58.788,10.704 58.966,10.882 58.966,11.247 58.793,11.42 58.793,11.549 58.956,11.712 59.085,11.712 59.439,11.358 59.597,11.358 59.709,11.47 59.709,11.649 58.866,12.491 58.866,12.67 59.255,13.058 59.451,13.058 59.726,12.783 59.994,12.783 60.129,12.919 60.129,13.604 U10.AA11@60.221,13.696
DDR_CH1_DQ9_C: U8.B3 U10.C11 | length 26.4
  Top Layer w0.156: U8.B3@55.921,33.367 55.95,33.338 56.179,33.338 56.292,33.226 56.519,33.226 56.816,32.929 58.118,32.929 58.328,33.139 65.81,33.139 70.99,27.96 70.99,22.632 70.304,21.946 70.304,21.814 70.097,21.607 69.967,21.607 69.854,21.72 69.854,21.994 69.664,22.183 69.289,22.183 68.941,21.836 68.801,21.836 68.702,21.935 68.528,21.935 U10.C11@68.494,21.969
DDR_CH1_DQ9_D: U8.B22 U10.Y11 | length 27.9
  Top Layer w0.156: U8.B22@47.189,24.635 47.189,24.177 47.962,23.404 48.149,23.217 48.149,22.723 48.913,21.96 48.913,21.653 49.676,20.89 49.676,16.944 50.035,16.585 50.035,15.148 54.795,10.389 59.465,10.389 60.453,11.376 60.453,11.556 60.183,11.825 60.183,12.005 60.363,12.185 60.542,12.185 60.812,11.915 60.991,11.915 61.171,12.095 61.171,12.287 60.452,13.006 60.452,13.275 60.68,13.503 U10.Y11@60.68,14.156
DDR_CH1_DQ10_C: U8.A2 U10.E11 | length 27.7
  Top Layer w0.156: U8.A2@56.84,33.367 56.843,33.365 57.938,33.365 58.22,33.648 66.02,33.648 71.498,28.17 71.498,22.422 69.613,20.537 69.253,20.537 69.247,20.53 69.142,20.53 68.92,20.53 68.914,20.537 68.535,20.537 68.021,21.05 U10.E11@67.575,21.05
DDR_CH1_DQ10_D: U8.A23 U10.V11 | length 22.6
  Top Layer w0.156: U8.A23@47.186,23.714 47.878,23.023 47.878,22.63 48.433,22.075 v1(48.433,21.407) ; U10.V11@61.564,15.06 61.565,15.06 61.618,15.008 61.618,14.625 v1(61.665,14.577)
  Layer 4 w0.156: v1(48.433,21.407) 48.377,21.351 48.377,21.073 48.329,21.026 48.329,20.828 56.158,12.999 58.926,12.999 60.297,12.999 60.389,13.091 60.389,13.22 60.236,13.374 60.236,13.783 60.454,14.001 60.583,14.001 60.675,13.909 60.675,13.688 60.776,13.587 61.157,13.587 61.665,14.095 v1(61.665,14.577)
DDR_CH1_DQ11_C: U8.B2 U10.F11 | length 23.1
  Top Layer w0.142: v1(56.36,33.716) 56.36,33.806 U8.B2@56.379,33.825
  Top Layer w0.156: U10.F11@67.109,20.58 67.136,20.554 67.233,20.554 67.241,20.546 67.484,20.546 67.498,20.561 67.591,20.561 v1(67.64,20.609)
  Layer 4 w0.142: v1(56.36,33.716) 56.963,33.716 57.2,33.479 58.107,33.479 58.208,33.58 58.517,33.58 ; 58.517,33.58 61.418,33.58 69.651,25.347 69.651,25.245 69.651,23.721 69.651,23.712 69.651,22.62 v1(67.64,20.609)
DDR_CH1_DQ11_D: U8.B23 U10.U11 | length 24.6
  Top Layer w0.156: U8.B23@46.727,24.174 46.727,23.706 47.496,22.938 47.62,22.814 47.62,22.523 47.643,22.5 47.643,22.37 47.804,22.209 v1(47.804,22.14) ; U10.U11@62.054,15.524 62.054,15.077 62.551,14.58 62.551,13.939 62.551,13.65 v1@62.512,13.611
  Layer 4 w0.142: v1(47.804,22.14) 47.753,22.089 47.753,20.844 55.978,12.618 59.307,12.618 61.23,12.618 61.694,12.618 62.399,13.323 62.399,13.336 62.595,13.532 v1@62.608,13.532
  other v1: 62.51,13.519
DDR_CH1_DQ12_C: U8.A5 U10.F9 | length 26.5
  Top Layer w0.156: U8.A5@55.462,31.989 55.891,31.559 56.023,31.559 56.984,30.598 64.759,30.598 66.184,29.174 66.184,28.994 65.575,28.385 65.575,27.771 66.649,26.697 66.649,26.373 66.454,26.178 66.454,26.01 66.655,25.808 66.655,25.661 66.543,25.55 66.386,25.55 66.184,25.751 66.027,25.751 65.915,25.639 65.915,25.482 66.116,25.28 66.116,25.123 66.005,25.011 65.847,25.011 65.645,25.212 65.488,25.212 65.376,25.101 65.376,24.943 65.578,24.741 65.578,24.584 65.466,24.472 65.308,24.472 65.107,24.674 64.949,24.674 64.853,24.577 64.853,24.398 65.392,23.859 65.392,23.717 65.265,23.59 65.122,23.59 64.853,23.859 64.478,23.859 64.387,23.767 64.387,23.637 65.338,22.686 65.481,22.686 65.55,22.618 65.55,22.604 65.739,22.415 65.753,22.415 66.306,21.862 66.444,21.862 66.604,21.701 66.604,21.571 66.557,21.524 ; U10.F9@66.029,21.694 66.12,21.603 66.182,21.603 66.329,21.456 66.494,21.456 66.543,21.504
DDR_CH1_DQ12_D: U8.A20 U10.U9 | length 26.7
  Top Layer w0.156: U8.A20@48.567,25.094 50.79,22.871 50.933,22.871 52.232,21.572 52.232,17.98 52.577,17.636 52.577,16.199 53.559,15.216 53.739,15.216 54.098,15.576 54.278,15.576 54.405,15.448 54.405,15.291 54.024,14.91 54.024,14.752 54.151,14.625 54.309,14.625 54.69,15.006 54.847,15.006 54.975,14.879 54.975,14.699 54.615,14.34 54.615,14.16 54.815,13.96 54.995,13.96 55.424,14.389 55.424,14.609 55.671,14.857 55.671,15.017 55.483,15.205 55.483,15.367 55.575,15.459 55.762,15.459 55.93,15.291 56.11,15.291 56.527,15.708 ; 56.522,15.708 56.76,15.946 56.76,16.125 56.66,16.226 56.66,16.463 56.684,16.487 56.684,16.532 56.826,16.675 57.112,16.675 57.211,16.576 57.475,16.576 57.885,16.986 57.885,17.251 57.743,17.393 57.743,17.561 58.193,18.011 59.374,18.011 59.677,17.708 59.677,17.691 59.908,17.46 59.925,17.46 60.035,17.35 60.035,17.088 60.467,16.656 U10.U9@60.918,16.656
DDR_CH1_DQ13_C: U8.B5 U10.E9 | length 26.9
  Top Layer w0.156: U8.B5@55.002,32.448 55.508,32.448 55.599,32.357 55.599,32.314 55.786,32.127 55.897,32.127 56.918,31.106 64.969,31.106 66.913,29.163 66.913,29.005 66.083,28.175 66.083,28.017 66.254,27.846 66.536,27.846 66.662,27.972 66.841,27.972 66.969,27.845 66.969,27.666 66.78,27.477 66.78,27.32 66.892,27.208 67.05,27.208 67.481,27.639 67.661,27.639 67.788,27.512 67.788,27.332 ; U10.E9@66.443,22.182 66.414,22.211 66.414,22.521 66.2,22.735 66.2,22.884 66.194,22.89 66.194,22.896 66.022,23.068 66.022,23.122 65.912,23.232 65.912,23.405 65.733,23.584 65.733,24.231 65.913,24.412 66.071,24.412 66.315,24.168 66.473,24.168 66.584,24.279 66.584,24.437 66.341,24.681 66.341,24.839 66.452,24.95 66.61,24.95 66.789,24.771 66.919,24.771 67.058,24.911 67.058,25.041 66.865,25.234 66.865,25.459 67.088,25.682 67.391,25.682 67.489,25.781 67.489,25.911 67.398,26.002 67.058,26.002 66.966,26.094 66.966,26.284 67.058,26.376 67.388,26.376 67.487,26.475 67.487,26.64 67.344,26.783 67.344,26.913 67.754,27.323
DDR_CH1_DQ13_D: U8.B20 U10.V9 | length 27.9
  Top Layer w0.156: U8.B20@48.105,25.552 48.105,25.085 48.731,24.46 48.731,24.356 48.822,24.264 49.676,23.41 51.724,21.362 51.724,17.77 52.069,17.426 52.069,15.989 55.334,12.724 55.513,12.724 55.693,12.903 55.693,13.083 55.354,13.421 55.354,13.601 55.962,14.209 55.962,14.43 56.232,14.699 56.455,14.699 56.772,15.017 56.772,15.382 56.993,15.603 57.173,15.603 57.334,15.442 57.513,15.442 57.641,15.569 57.641,15.727 57.439,15.928 57.439,16.086 57.551,16.198 57.709,16.198 57.91,15.996 58.068,15.996 58.179,16.108 58.179,16.266 57.978,16.467 57.978,16.625 58.09,16.737 58.247,16.737 58.449,16.535 58.607,16.535 58.746,16.675 58.746,16.854 58.316,17.285 58.316,17.464 58.585,17.734 58.765,17.734 59.143,17.356 59.143,16.817 59.285,16.675 59.529,16.675 59.997,16.206 U10.V9@60.468,16.206
DDR_CH1_DQ14_C: U8.A4 U10.C9 | length 25.8
  Top Layer w0.156: U8.A4@55.921,32.448 55.941,32.448 56.774,31.615 65.18,31.615 67.632,29.163 67.632,29.005 67.161,28.534 67.161,28.356 67.252,28.265 67.43,28.265 67.901,28.735 68.059,28.735 68.215,28.579 68.215,28.45 67.952,28.187 67.952,27.933 68.843,27.041 68.843,26.912 68.751,26.82 67.965,26.82 67.801,26.657 67.801,26.44 67.893,26.348 68.061,26.348 68.174,26.462 68.354,26.462 68.481,26.335 68.481,26.142 68.354,26.014 67.943,26.014 67.816,25.887 67.816,25.745 67.924,25.637 68.138,25.637 68.265,25.51 68.265,25.107 68.057,24.899 67.943,24.899 67.816,25.026 67.816,25.206 67.637,25.386 67.457,25.386 67.367,25.296 67.367,25.116 67.457,25.026 67.457,24.829 66.941,24.313 66.941,23.962 67.357,23.546 67.357,23.106 U10.C9@67.363,23.101
DDR_CH1_DQ14_D: U8.A21 U10.Y9 | length 28
  Top Layer w0.156: U8.A21@48.092,24.615 48.106,24.615 U8.A21@48.108,24.614 ; U8.A21@48.108,24.635 U8.A21@48.108,24.614 ; 56.377,12.434 56.408,12.434 56.763,12.789 56.9,12.789 57.02,12.67 57.02,12.521 56.784,12.286 56.784,12.055 56.642,11.913 55.426,11.913 51.56,15.779 51.56,17.215 51.201,17.575 51.201,21.167 49.227,23.141 49.227,23.494 U8.A21@48.108,24.614 ; 56.377,12.436 56.293,12.436 56.136,12.593 56.136,12.723 56.228,12.815 56.367,12.815 56.458,12.906 56.458,13.036 56.054,13.44 56.054,13.582 56.181,13.71 56.323,13.71 56.771,13.262 56.928,13.262 57.052,13.386 57.052,13.543 56.612,13.983 56.612,14.14 56.663,14.191 56.665,14.191 56.726,14.252 56.881,14.252 57.321,13.813 57.479,13.813 57.59,13.924 57.59,14.082 57.151,14.522 57.151,14.677 57.265,14.791 57.42,14.791 57.86,14.351 58.017,14.351 58.096,14.43 58.118,14.43 59.172,15.484 59.352,15.484 U10.Y9@59.549,15.287
DDR_CH1_DQ15_C: U8.B4 U10.B9 | length 26.1
  Top Layer w0.156: U8.B4@55.462,32.908 55.6,33.046 55.78,33.046 56.703,32.123 65.39,32.123 68.804,28.708 68.804,28.425 68.472,28.093 68.472,27.963 69.157,27.277 69.956,27.277 70.047,27.186 70.047,26.947 69.92,26.82 69.641,26.82 69.011,26.19 69.011,26.06 69.129,25.942 69.271,25.942 69.433,26.104 69.612,26.104 69.702,26.014 69.702,25.835 69.612,25.745 69.612,25.565 69.882,25.296 69.884,25.296 69.884,25.191 69.703,25.01 69.523,25.01 69.38,25.154 69.201,25.154 69.11,25.063 69.11,24.981 69.074,24.945 69.074,24.847 69.292,24.629 69.292,24.449 69.074,24.231 69.074,23.999 68.895,23.821 68.663,23.821 68.214,23.372 68.214,23.266 67.981,23.034 67.799,23.034 67.672,23.161 67.672,23.41 U10.B9@67.822,23.56
DDR_CH1_DQ15_D: U8.B21 U10.AA9 | length 27.9
  Top Layer w0.156: U8.B21@47.648,25.094 47.648,24.607 47.762,24.493 47.778,24.493 48.315,23.956 48.315,23.94 48.407,23.848 48.868,23.387 48.868,22.961 49.856,21.973 49.856,21.794 50.692,20.957 50.692,17.365 51.052,17.005 51.052,15.568 55.215,11.405 57.248,11.405 57.593,11.75 57.751,11.75 57.951,11.55 58.109,11.55 58.22,11.662 58.22,11.819 57.291,12.749 57.291,12.907 57.381,12.996 57.538,12.996 58.182,12.352 58.34,12.352 58.452,12.464 58.452,12.622 57.819,13.255 57.819,13.412 57.925,13.518 57.946,13.497 58.115,13.497 58.559,13.053 58.715,13.053 58.794,13.131 58.807,13.145 58.807,13.344 58.637,13.514 58.637,13.694 58.868,13.925 ; 58.868,13.925 59.056,14.114 59.34,14.397 59.34,14.577 U10.AA9@59.09,14.828
DDR_CH1_DQS0N_C: U8.D9 U10.E3 | length 15.5
  Top Layer w0.112: v1(62.95,26.128) 62.95,25.705 63.044,25.611 U10.E3@63.044,25.565
  Layer 4 w0.105: v1(52.252,31.439) 52.318,31.505 52.318,31.758 52.42,31.86 53.152,31.86 53.696,31.316 60.09,31.316 62.986,28.42 62.986,27.218 63.131,27.073 63.131,26.768 63.131,26.368 62.95,26.187 v1(62.95,26.128)
DDR_CH1_DQS0N_D: U8.G16 U10.V3 | length 21.6
  Top Layer w0.112: v1(56.498,19.573) 56.52,19.596 56.528,19.588 57.066,19.588 U10.V3@57.069,19.59
  Layer 4 w0.105: v1@47.553,29.891 47.505,29.94 47.418,29.94 47.373,29.895 47.373,29.091 47.921,28.542 47.921,28.138 47.673,27.89 47.673,27.78 47.792,27.661 47.879,27.661 47.886,27.669 47.937,27.669 48.302,28.034 48.803,28.034 49.481,27.356 ; 49.523,27.342 49.688,27.342 51.47,25.56 51.584,25.56 51.831,25.807 52.026,25.807 52.43,25.403 52.43,25.309 52.222,25.101 52.222,24.979 52.336,24.865 52.423,24.865 52.615,25.057 52.783,25.057 53.177,24.664 53.177,24.562 52.923,24.308 52.923,24.1 53.53,23.493 53.53,23.175 53.324,22.97 53.324,22.883 53.403,22.805 53.477,22.805 53.55,22.878 ; 53.545,22.883 53.853,23.191 54.167,23.191 54.39,22.968 54.39,22.71 54.121,22.44 54.121,22.353 54.196,22.278 54.308,22.278 54.545,22.515 54.813,22.515 55.104,22.225 55.104,21.957 54.641,21.494 54.641,21.407 54.774,21.274 54.976,21.274 55.389,21.687 55.613,21.687 55.671,21.628 ; 55.696,21.614 56.043,21.267 56.043,20.709 56.012,20.678 56.012,19.693 56.074,19.632 56.439,19.632 v1(56.498,19.573)
  other v1: 47.642,29.737
DDR_CH1_DQS0P_C: U8.E9 U10.D3 | length 15.6
  Top Layer w0.112: v1(63.5,26.592) 63.502,26.59 63.502,26.027 U10.D3@63.503,26.025
  Layer 4 w0.105: v1(51.722,32.039) 51.749,32.067 53.237,32.067 53.781,31.523 60.175,31.523 62.992,28.706 63.193,28.505 63.193,27.304 63.338,27.159 63.338,26.825 63.5,26.663 v1(63.5,26.592)
DDR_CH1_DQS0P_D: U8.H16 U10.W3 | length 22.2
  Top Layer w0.112: v1@56.138,19.132 56.143,19.136 56.604,19.136 U10.W3@56.609,19.131
  Layer 4 w0.105: v1@47.157,30.226 47.157,28.969 47.708,28.418 47.708,28.24 47.337,27.869 47.337,27.78 47.759,27.359 47.957,27.359 48.409,27.811 48.653,27.811 48.915,27.549 ; 48.912,27.547 49.323,27.136 49.597,27.136 51.385,25.347 51.663,25.347 51.873,25.558 51.96,25.558 52.122,25.396 52.122,25.309 51.968,25.154 51.968,24.867 52.272,24.562 52.455,24.562 52.646,24.752 52.732,24.752 52.859,24.626 52.859,24.539 52.636,24.316 52.636,24.049 53.316,23.368 53.316,23.254 53.06,22.998 53.06,22.84 53.398,22.502 53.512,22.502 53.994,22.985 54.081,22.985 54.184,22.882 54.184,22.795 53.837,22.449 53.837,22.314 53.964,22.187 ; 53.965,22.189 54.035,22.119 54.046,22.119 54.106,22.059 54.398,22.059 54.636,22.297 54.723,22.297 54.885,22.134 54.885,22.048 54.422,21.585 54.422,21.317 54.684,21.055 54.976,21.055 54.988,21.067 55.061,21.067 55.43,21.435 55.582,21.435 55.816,21.202 55.816,20.803 55.785,20.772 55.785,19.599 56.021,19.363 56.021,19.361 56.047,19.335 56.047,19.332 56.155,19.224 v1(56.155,19.141)
  other v1: 47.168,30.22
DDR_CH1_DQS1N_C: U8.D5 U10.E10 | length 23.7
  Top Layer w0.112: U10.E10@67.02,21.626 67.067,21.578 67.437,21.578 v1(67.464,21.551) ; U10.E10@67.025,21.588 U10.E10@67.034,21.578
  Layer 4 w0.105: v1(54.14,33.346) 54.085,33.29 54.085,32.902 54.498,32.489 54.512,32.504 61.377,32.504 61.688,32.192 61.688,31.948 61.162,31.423 61.162,31.319 61.317,31.164 61.439,31.164 61.998,31.722 62.282,31.722 62.289,31.716 62.371,31.716 63.377,30.709 66.677,27.409 66.677,27.011 ; 66.676,27.011 66.676,24.6 67.551,23.725 67.551,21.663 v1@67.556,21.659
DDR_CH1_DQS1N_D: U8.E21 U10.V10 | length 25.5
  Top Layer w0.112: U10.V10@61.028,15.631 61.042,15.617 61.042,15.15 v1(61.056,15.136)
  Layer 4 w0.105: v1(46.251,26.481) 46.303,26.533 46.493,26.533 46.527,26.566 46.945,26.566 47.035,26.476 47.085,26.476 47.308,26.254 47.308,25.709 48.16,24.857 48.16,24.362 49.161,23.361 49.161,22.309 49.915,21.555 49.915,21.049 50.422,20.542 50.532,20.433 ccw(c50.632,20.532) 50.732,20.433 50.781,20.482 cw(c51.028,20.236) 51.239,20.513 51.244,20.513 51.304,20.452 51.304,20.448 cw(c51.028,20.236) 51.274,19.99 51.055,19.772 ccw(c51.156,19.672) 51.256,19.573 51.473,19.79 cw(c51.72,19.545) 51.966,19.791 cw(c51.72,19.545) 51.966,19.299 51.747,19.08 ccw(c51.847,18.98) 51.948,18.881 ; 51.948,18.881 52.165,19.098 cw(c52.412,18.853) 52.623,19.129 52.627,19.129 52.688,19.069 52.688,19.064 cw(c52.412,18.853) 52.658,18.607 52.608,18.557 ccw(c52.708,18.457) 52.608,18.357 53.109,17.855 56.498,14.467 57.591,14.467 57.987,14.863 58.73,14.863 59.286,15.419 60.48,15.419 60.804,15.095 60.948,15.095 v1@61.034,15.181